# Altium PCB Analog_Project_Channels.PcbDoc (part 1 of 2)
Units mil, origin at the board's own origin, x right, y up, seen from the top; angles counter-clockwise.
Board outline 5930 x 2510 mil, 2 copper layers (Top Layer, Bottom Layer); 96 components, 61 nets, 270 pads, 10 vias.
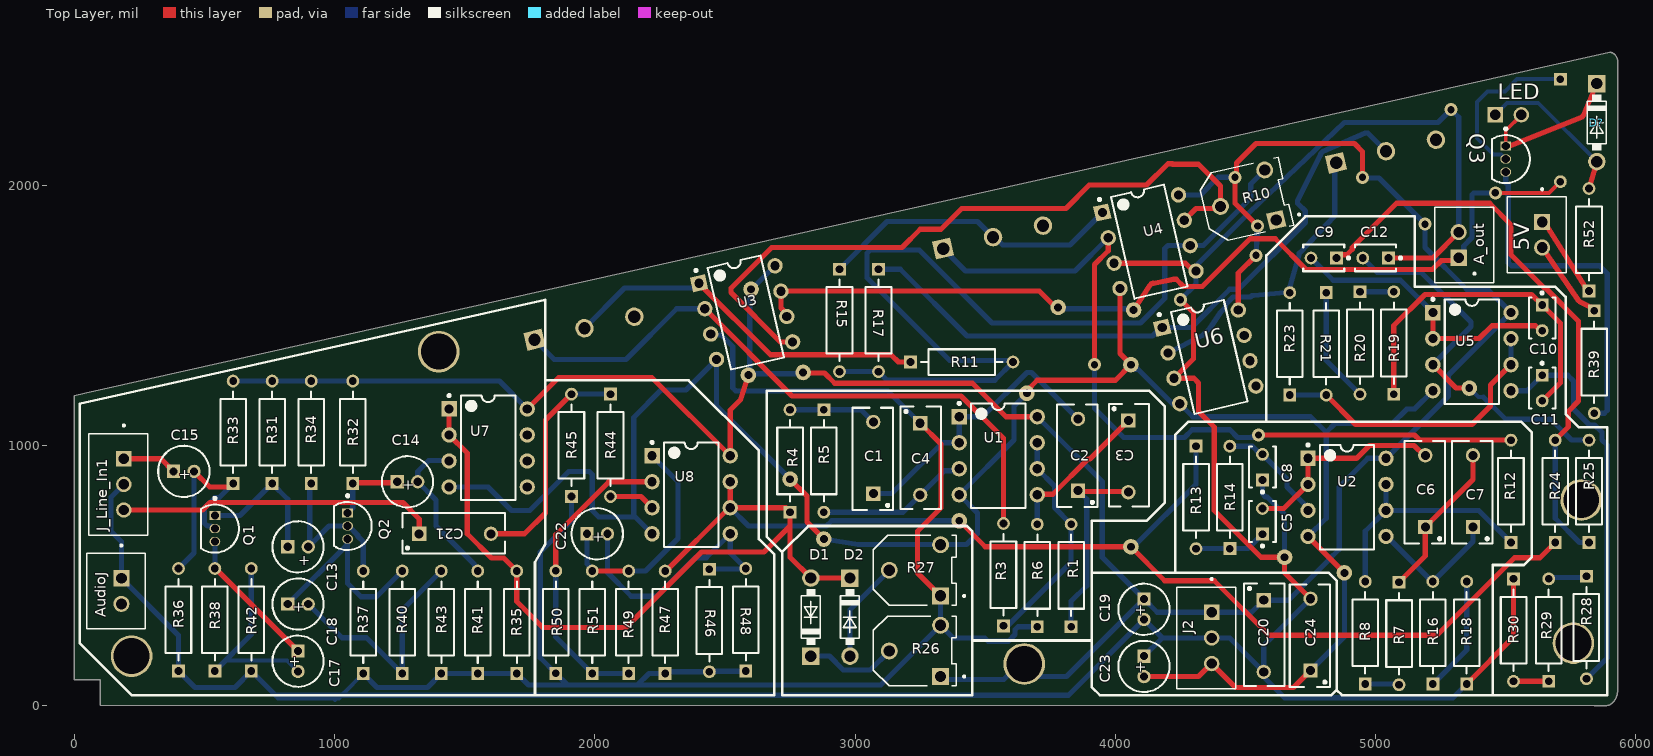
[diagram p0: Top Layer view]
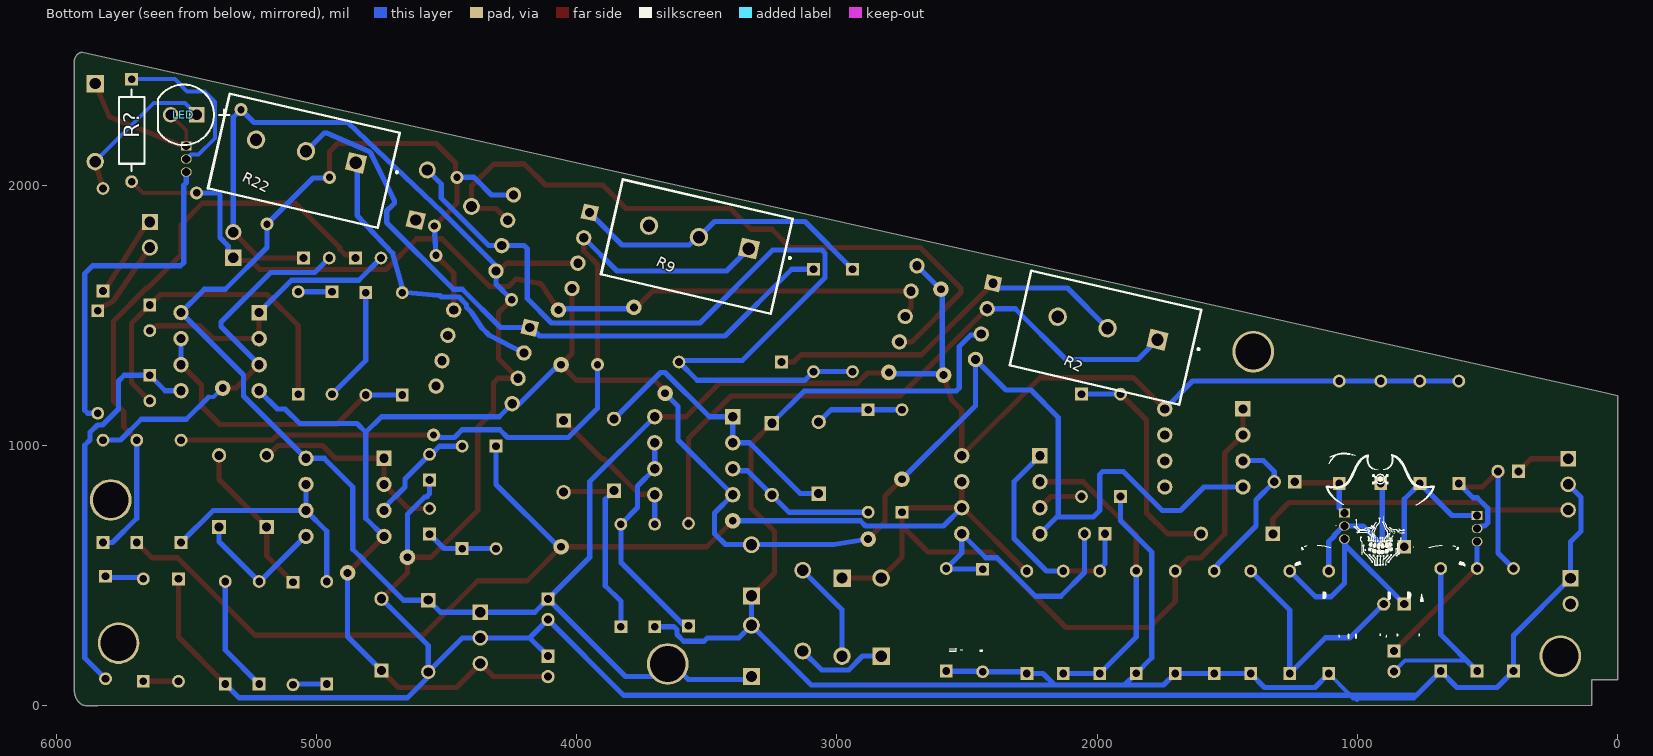
[diagram p1: Bottom Layer view, seen from below]
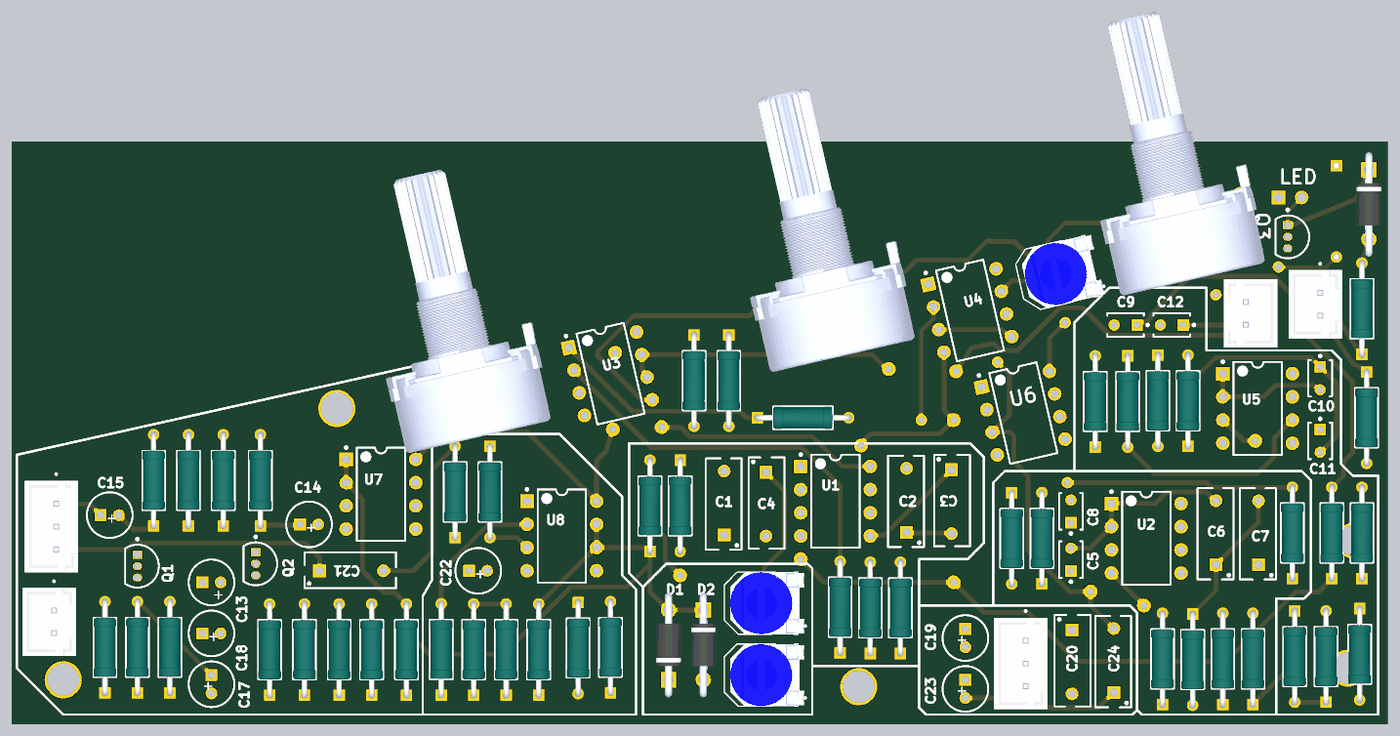
[diagram p2: 3D render of the assembled board from above, using the file's embedded part models]
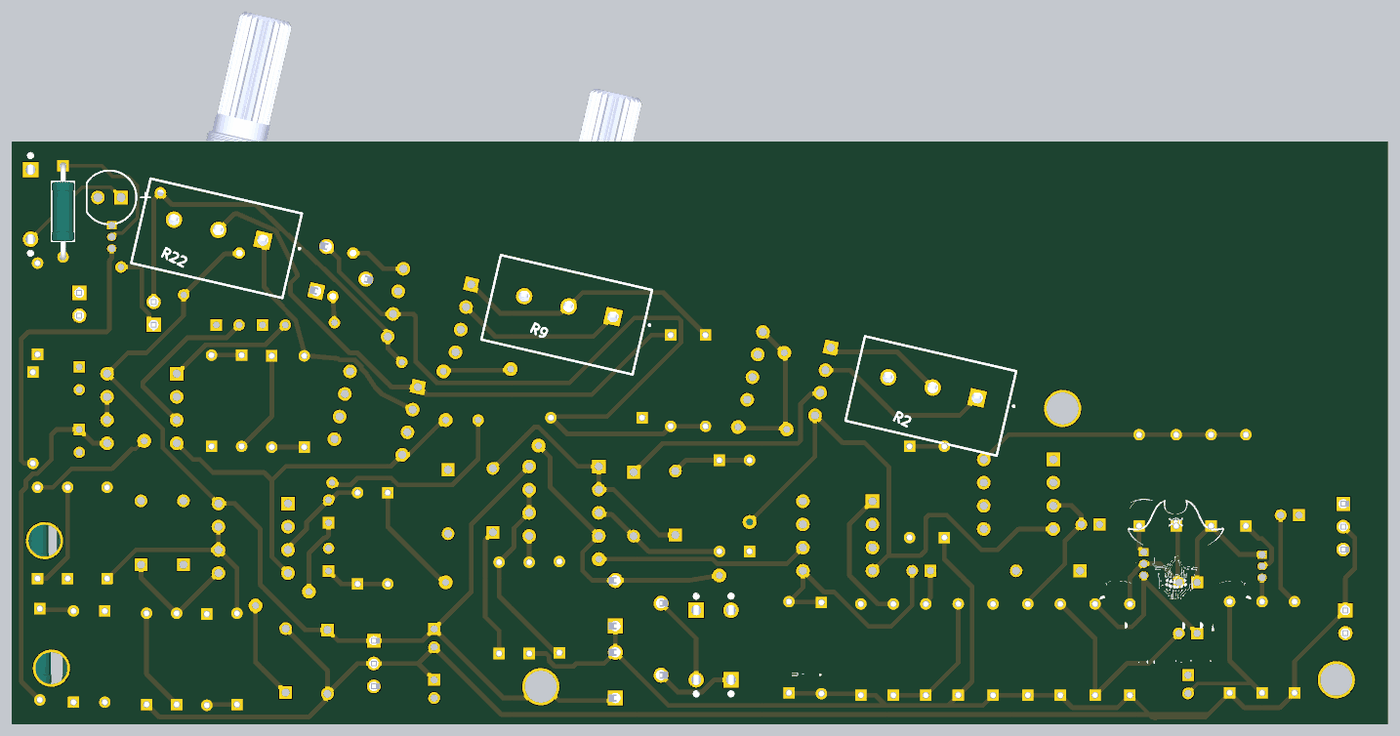
[diagram p3: 3D render of the assembled board from below, using the file's embedded part models]

## Layer stack, top to bottom
Top Solder: solder mask 0.4, Solder Resist, Dk 3.5
Top Layer: signal copper 1.4
Dielectric 1: dielectric 12.6, FR-4, Dk 4.8
Bottom Layer: signal copper 1.4
Bottom Solder: solder mask 0.4, Solder Resist, Dk 3.5

## Board outline
0,100 100,100 100,45.86 100,1.72 5840,0 5885.86,0 ccw(c5885.86,34.14) 5910,10 ccw(c5861.72,58.28) 5930,58.28 5930,2475.86 ccw(c5895.86,2475.86) 5920,2500 5917.07,2502.93 ccw(c5900,2485.86) 5900,2510 40,1200 0,1190

## Design rules (kind name [scope] priority, off if disabled: settings)
BoardOutlineClearance [All] p1: gap=11.81 ignorepadtopadclearanceinfootprint=FALSE except(15.75: Arc-SplitBarrior Arc-SplitContinuation Track-SplitBarrior Track-SplitContinuation SMDPad-SplitBarrior SMDPad-SplitContinuation THPad-SplitBarrior THPad-SplitContinuation Via-SplitBarrior Via-SplitContinuation Fill-SplitBarrior Fill-SplitContinuation Poly-SplitBarrior Poly-SplitContinuation Region-SplitBarrior Region-SplitContinuation Text-SplitBarrior Text-SplitContinuation)
Clearance "Clearance Different Nets" [All] p1: gap=7.87 ignorepadtopadclearanceinfootprint=FALSE except(3.5: Arc-Arc Arc-Track Arc-SMDPad Track-Track Track-SMDPad; 5: SMDPad-SMDPad SMDPad-Via THPad-Via Via-Via; 10: Arc-Via Arc-Text Track-Via Track-Text SMDPad-Text THPad-Text Via-Text Fill-Text Poly-Text Region-Text Text-Text; 19.68: THPad-THPad Via-Hole)
Clearance "Clearance Same Nets" [All] p2: gap=7.87 ignorepadtopadclearanceinfootprint=FALSE except(3.5: Arc-Arc Arc-Track Arc-SMDPad Track-Track Track-SMDPad SMDPad-SMDPad; 5: SMDPad-Via THPad-Via; 10: Arc-Via Arc-Text Track-Via Track-Text SMDPad-Text THPad-Text Via-Via Via-Text Fill-Text Poly-Text Region-Text Text-Text)
Clearance "Clearance Bottom Layer" [OnLayer('Bottom Layer')] p3: gap=8 ignorepadtopadclearanceinfootprint=TRUE except(10: Arc-Text Track-Text SMDPad-Text THPad-Text Via-Text Fill-Text Poly-Text Region-Text Text-Text)
Clearance "Clearance Top Layer" [OnLayer('Top Layer')] p4: gap=8 ignorepadtopadclearanceinfootprint=TRUE except(10: Arc-Text Track-Text SMDPad-Text THPad-Text Via-Text Fill-Text Poly-Text Region-Text Text-Text)
HoleSize [All] p1: absolutevalues=TRUE maxlimit=248.03 minlimit=7.87 maxpercent=80.000 minpercent=20.000
MinimumAnnularRing [All] p1: minimumring=5.12
MinimumSolderMaskSliver [All] p1: minsoldermaskwidth=3.94
PolygonConnect PolygonConnect_1 [All] p1: thpad.connectstyle=Relief thpad.reliefconductorwidth=20 thpad.reliefentries=4 thpad.polygonreliefangle="90 Angle" thpad.airgapwidth=10 smdpad.connectstyle=Relief smdpad.reliefconductorwidth=20 smdpad.reliefentries=4 smdpad.polygonreliefangle="90 Angle" smdpad.airgapwidth=10 via.connectstyle=Direct via.reliefconductorwidth=20 via.reliefentries=4 via.polygonreliefangle="90 Angle" via.airgapwidth=10
RoutingCorners [All] p1: cornerstyle=Round minsetback=100 maxsetback=100
RoutingVias [All] p1: holewidth=19.68 width=39.37 viastyle="Through Hole" minholewidth=7.87 minwidth=13.78 maxholewidth=39.37 maxwidth=78.74
SilkToSilkClearance [All] p1: silktosilkclearance=3.94
SilkToSolderMaskClearance [IsPad] p1: minsilkscreentomaskgap=3.94 clearancetoexposedcopper=TRUE
SolderMaskExpansion [All] p1: expansion=4 istentingtop=FALSE
SupplyNets "Schematic Supply Nets" [InNet('GND')] p1: voltage=0.000
Width [All] p1: maxlimit=100 minlimit=3.5 preferedwidth=15
25 further rules are at their usual default settings.

## Components (designator, comment, footprint, x,y, rotation, side; value= is the part's Value field where it differs from the comment)
5V "B2B-XH-A_(LF)(SN)" JST_B2B-XH-A_(LF)(SN) 5619.33,1809.21 r90 top
A_out "B2B-XH-A_(LF)(SN)" JST_B2B-XH-A_(LF)(SN) 5340,1770 r270 top
AudioJ "B2B-XH-A_(LF)(SN)" JST_B2B-XH-A_(LF)(SN) 160,440 r90 top (schematic designator J_FromAudioJack1)
C1 "100nF 50V Ceramic" "100nF Cap" 3070,949.41 r90 top
C2 "100nF 50V Ceramic" "100nF Cap" 3856.54,961.06 r90 top
C3 "100nF 50V Ceramic" "100nF Cap" 4050,960.59 r270 top
C4 "100nF 50V Ceramic" "100nF Cap" 3250,950 r270 top
C5 "K104K15X7RF5TL2" "10nF Cap" 4565.11,708.12 r90 top
C6 "100nF 50V Ceramic" "100nF Cap" 5190.99,821.07 r90 top
C7 "100nF 50V Ceramic" "100nF Cap" 5373.87,821.07 r90 top
C8 "K104K15X7RF5TL2" "10nF Cap" 4565.11,916.11 r90 top
C9 "K104K15X7RF5TL2" "10nF Cap" 4800.79,1720 r180 top
C10 "K104K15X7RF5TL2" "10nF Cap" 5640,1490 r270 top
C11 "K104K15X7RF5TL2" "10nF Cap" 5640,1220 r270 top
C12 "K104K15X7RF5TL2" "10nF Cap" 5000,1720 r180 top
C13 "ECA1HM100" "10uF 25V" 859.37,610 r0 top
C14 "ECA1HM100" "10uF 25V" 1280,860 r0 top
C15 "ECA1HM100" "10uF 25V" 420.63,900 r0 top
C17 "22uF 50V" "10uF 25V" 859.37,170.63 r270 top
C18 "22uF 50V" "10uF 25V" 859.37,390 r0 top
C19 "ECA1HM100" "10uF 25V" 4110,370 r270 top
C20 "100nF 50V Ceramic" "100nF Cap" 4570,270 r270 top
C21 "100nF 50V Ceramic" "100nF Cap" 1460,660 r0 top
C22 "ECA1HM100" "10uF 25V" 2009.37,660 r0 top
C23 "ECA1HM100" "10uF 25V" 4110,150.63 r270 top
C24 "100nF 50V Ceramic" "100nF Cap" 4750,270 r90 top
D1 "1N4001" 1N400X 2830,340 r90 top
D2 "1N4001" 1N400X 2980,340 r270 top
D? "1N4001" 1N400X 5850,2240 r270 top
J2 "B3B-XH-A_(LF)(SN)" "JST_B3B-XH-A (LF)(SN)" 4349.33,260 r90 top
J_Line_In1 "B3B-XH-A_(LF)(SN)" "JST_B3B-XH-A (LF)(SN)" 169.33,850 r90 top
LED "Comment" CGX-G502DC 5510,2270 r0 bottom
Q1 "BC547B" BC547B#1 540,680 r270 top
Q2 "BC547B" BC547B#1 1050,690 r270 top
Q3 "BC547B" BC547B#2 5500,2100 r270 top
R1 "47K 0.25W" "0.25W Carbon film" 3830,500 r90 top
R2 "Rotary_Pot" Rotary_pot 1768.19,1405.72 r13 bottom
R3 "1K 0.25W" "0.25W Carbon film" 3570,503.15 r90 top value=1kΩ
R4 "3.3K 0.25W" "0.25W Carbon film" 2750,940 r90 top
R5 "3.3K 0.25W" "0.25W Carbon film" 2880,940 r270 top
R6 "47K 0.25W" "0.25W Carbon film" 3700,500 r90 top
R7 "3.3K 0.25W" "0.25W Carbon film" 5090,276.85 r270 top
R8 "3.3K 0.25W" "0.25W Carbon film" 4960,280 r90 top
R9 "Rotary_Pot" Rotary_pot 3338.19,1755.72 r13 bottom
R10 "TRIM_pot" TRIM_Pot 4500,1940 r13 top
R11 "66K 0.5W" "0.25W Carbon film" 3410,1320 r0 top
R12 "1K 0.25W" "0.25W Carbon film" 5520,823.15 r90 top value=1kΩ
R13 "3.3K 0.25W" "0.25W Carbon film" 4310,800 r270 top
R14 "3.3K 0.25W" "0.25W Carbon film" 4440,800 r90 top
R15 "66K 0.5W" "0.25W Carbon film" 2940,1480 r270 top
R16 "3.3K 0.25W" "0.25W Carbon film" 5220,280 r90 top
R17 "66K 0.5W" "0.25W Carbon film" 3090,1480 r270 top
R18 "3.3K 0.25W" "0.25W Carbon film" 5350,280 r90 top
R19 "470R 0.25W" "0.25W Carbon film" 5070,1393.15 r90 top
R20 "1K 0.25W" "0.25W Carbon film" 4940,1393.15 r270 top value=1kΩ
R21 "1K 0.25W" "0.25W Carbon film" 4810,1390 r270 top value=1kΩ
R22 "Rotary_Pot" Rotary_pot 4848.19,2085.72 r13 bottom
R23 "1K 0.25W" "0.25W Carbon film" 4670,1390 r90 top value=1kΩ
R24 "680R 0.25W" "0.25W Carbon film" 5690,823.15 r90 top
R25 "680R 0.25W" "0.25W Carbon film" 5820,823.15 r90 top
R26 "TRIM_pot" TRIM_Pot 3230,210 r0 top
R27 "TRIM_pot" TRIM_Pot 3230,520 r0 top
R28 "1K 0.25W" "0.25W Carbon film" 5810,300 r270 top value=1kΩ
R29 "1K 0.25W" "0.25W Carbon film" 5665,290 r90 top value=1kΩ
R30 "470R 0.25W" "0.25W Carbon film" 5530,290 r270 top
R31 "3.3K 0.25W" "0.25W Carbon film" 760,1050 r90 top
R32 "3.3K 0.25W" "0.25W Carbon film" 1070,1050 r90 top
R33 "47K 0.25W" "0.25W Carbon film" 610,1050 r90 top
R34 "470K 0.25W" "0.25W Carbon film" 910,1050 r90 top
R35 "470K 0.25W" "0.25W Carbon film" 1700,320 r90 top
R36 "10K 0.25W" "0.25W Carbon film" 400,330 r90 top
R37 "100K 0.25W" "0.25W Carbon film" 1110,320 r90 top
R38 "330R 0.25W" "0.25W Carbon film" 540,330 r90 top
R39 "1K 0.5W" "0.25W Carbon film" 5840,1320 r270 top value=1kΩ
R40 "330R 0.25W" "0.25W Carbon film" 1260,320 r90 top
R41 "100K 0.25W" "0.25W Carbon film" 1550,320 r90 top
R42 "220R 0.25W" "0.25W Carbon film" 680,330 r90 top
R43 "220R 0.25W" "0.25W Carbon film" 1410,320 r90 top
R44 "3.3K 0.25W" "0.25W Carbon film" 2060,1000 r270 top
R45 "100K 0.25W" "0.25W Carbon film" 1910,1000 r90 top
R46 "47K 0.25W" "0.25W Carbon film" 2440,326.85 r270 top
R47 "470K 0.25W" "0.25W Carbon film" 2270,320 r90 top
R48 "470K 0.25W" "0.25W Carbon film" 2580,330 r90 top
R49 "47K 0.25W" "0.25W Carbon film" 2130,320 r90 top
R50 "3.3K 0.25W" "0.25W Carbon film" 1850,320.69 r90 top
R51 "47K 0.25W" "0.25W Carbon film" 1990,320 r90 top
R52 "1K 0.25W" "0.25W Carbon film" 5820,1790 r90 top value=1kΩ
R? "1K 0.5W" "0.25W Carbon film" 5710,2210 r270 bottom value=1kΩ
U1 "NE5532AP" NE5532 3550,960 r0 top
U2 "NE5532AP" NE5532 4890,800 r0 top
U3 "NE5532AP" NE5532 2580,1510 r13 top
U4 "NE5532AP" NE5532 4130.1,1782.41 r13 top
U5 "NE5532AP" NE5532 5370,1360 r0 top
U6 "NE5532AP" NE5532 4360,1340 r13 top
U7 "NE5532AP" NE5532 1590,990 r0 top
U8 "NE5532AP" NE5532 2370,810 r0 top

## Footprints (in the part's own frame and the unit in brackets; to place one, negate y for a bottom-side part, rotate by r counter-clockwise, add the part's x,y. Pads: shape width x height; smd on the part's side, far side on the other; paste and mask are expansions set on the pad)
"0.25W Carbon film" [mm]
  rect 1.25x1.25 hole 0.75 paste-2539.97 mask+0: 1(-5,0)
  round 1.25 hole 0.75 paste-2539.97 mask+0: 2(5,0)
  silkscreen extent -3.98,-1.25 3.98,1.25, body extent -5.72,-1.35 5.72,1.35, height 0.25
1N400X [mm]
  round 1.7 hole 1.1: A(3.81,0)
  rect 1.7x1.7 / inner round 1.7 / far side rect 1.7x1.7 hole 1.1: C(-3.81,0)
  silkscreen extent -2.72,-0.95 2.72,0.92, body extent -5.74,-1.35 5.74,1.35, height 2.74
"10nF Cap" [mm] "THD, 2-Leads, Body 4x2.6mm"
  rect 1.25x1.25 hole 0.75: 1(-1.25,0)
  round 1.25 hole 0.75: 2(1.25,0)
  silkscreen extent -2.55,-1.3 2,1.3, body extent -2,-1.3 2,1.3, height 5.6
"10uF 25V" [mm] "THD, 2-Leads, Dia 5mm, Body Length 11mm"
  rect 1.3x1.3 hole 0.8: 1(-1,0)
  round 1.3 hole 0.8: 2(1,0)
  silkscreen extent -2.5,-2.5 2.5,2.5, body extent -2.5,-2.5 2.5,2.5, height 12
"100nF Cap" [mil] "THD, 2-Leads, Body 4x2.6mm"
  rect 55x55 hole 35: 1(-135,0)
  round 55 hole 35: 2(140.59,0)
  silkscreen extent -199,-75 195,80, body extent -199,-76 192,80, height 394
BC547B#1 [mm] "TO, 3-Leads, Body Dia 4.7mm, Pitch 1.27mm"
  rect 0.889x1.05 hole 0.8: 1(-1.27,0)
  oval 0.889x1.05 hole 0.762: 2(0,0)
  oval 0.889x1.05 hole 0.8: 3(1.27,0)
  silkscreen extent -3.07,-1.34 2.35,2.35, body extent -2.35,-1.33 2.36,2.36, height 7.87
BC547B#2 [mm] "TO, 3-Leads, Body Dia 4.7mm, Pitch 1.27mm"
  rect 0.889x1.05 hole 0.8: 1(-1.27,0)
  oval 0.889x1.05 hole 0.8: 2(0,0) 3(1.27,0)
  silkscreen extent -3.07,-1.34 2.35,2.35, body extent -2.35,-1.33 2.36,2.36, height 7.87
CGX-G502DC [mm] "THD, 2-Leads, Dia 5.9mm, Pin Spacing 2.54mm"
  rect 1.5x1.5 hole 1: 1(-1.27,0)
  round 1.5 hole 1: 2(1.27,0)
  silkscreen extent -4.45,-2.95 2.5,2.95, body extent -2.95,-2.95 2.5,2.95, height 9.1
JST_B2B-XH-A_(LF)(SN) [mm]
  rect 1.575x1.575 / inner round 1.575 / far side rect 1.575x1.575 hole 1.05: 1(1.25,-0.525)
  round 1.575 hole 1.05: 2(-1.25,-0.525)
  silkscreen extent -3.7,-2.88 4.54,2.88, body extent -3.7,-2.88 3.7,2.88, height 7
"JST_B3B-XH-A (LF)(SN)" [mm]
  rect 1.508x1.508 / inner round 1.508 / far side rect 1.508x1.508 hole 1: 1(2.5,-0.525)
  round 1.508 hole 1: 2(0,-0.525) 3(-2.5,-0.525)
  silkscreen extent -4.95,-2.88 5.85,2.88, body extent -4.95,-2.88 4.95,2.88, height 7
NE5532 [mm] "DIP, 8-Leads, Body 10.15x6.6mm, Pitch 2.54mm"
  rect 1.5x1.5 hole 0.9: 1(-3.81,3.81)
  round 1.5 hole 0.9: 2(-3.81,1.27) 3(-3.81,-1.27) 4(-3.81,-3.81) 5(3.81,-3.81) 6(3.81,-1.27) 7(3.81,1.27) 8(3.81,3.81)
  silkscreen extent -3.93,-5.1 2.65,5.23, body extent -3.95,-5.07 3.95,5.07, height 5.08
Rotary_pot [mm]
  rect 1.8x1.8 / inner round 1.8 / far side rect 1.8x1.8 hole 1.2: 1(0,0)
  round 1.8 hole 1.2: 2(5,0) 3(10,0)
  silkscreen extent -4.2,-3.81 13.5,5.69, body extent -3.41,-23.91 13.59,5.59, height 2.8
TRIM_Pot [mm]
  rect 1.65x1.65 / inner round 1.65 / far side rect 1.65x1.65 hole 1.1: 1(2.5,-2.5)
  round 1.65 hole 1.1: 2(-2.5,0) 3(2.5,2.5)
  silkscreen extent -4.05,-3.41 4.9,3.41, body extent -3.4,-3.41 4.7,3.41, height 8.38

## Part data
5V A_out AudioJ: "Connector Header Through Hole 2 position 0.098 (2.50mm)", Package=None, Check_prices=https://www.snapeda.com/parts/B2B-XH-A%20(LF)(SN)/JST+Sales+America+Inc./view-part/?ref=eda, MF="JST Sales", MP="B2B-XH-A (LF)(SN)", SnapEDA_Link=https://www.snapeda.com/parts/B2B-XH-A%20(LF)(SN)/JST+Sales+America+Inc./view-part/?ref=snap
C1 C2 C3 C4 C6 C7 C20 C21 C24: "Ceramic Capacitor, 100 nF, +/- 10%, 50 V, -55 to 125 degC, 2-Pin THD, RoHS, Tape and Reel", Capacitance=0.1µF, Manufacturer=Vishay, Operating Temperature=-55°C~125°C, Package / Case=Radial, Package Description="2-Pin Through Hole Device, Body 4 x 2.6 mm", Package Reference=K104K15X7RF5TL2, Ratings=-, Standard Package=1, Temperature Coefficient=X7R, Tolerance=±10%, Voltage - Rated=50V, Applications=GeneralPurpose, Catalog Drawings=Mono-KapSide2-15_5.58Mono-KapSide1_15, Category=Capacitors, Datasheet URL=http://www.vishay.com/docs/45171/kseries.pdf, Datasheet Version=08/2013, Family=CeramicCapacitors, Features=-, Height - Seated (Max)="0.220\"(5.58mm)", Lead Spacing="0.098\"(2.50mm)", Lead Style=Straight, Manufacturer URL=http://www.vishay.com/, Mounting Technology=ThroughHole, Mounting Type=ThroughHole, Online Catalog=Mono-Kap™Series, Other Names=BC1084CT, Packaging=CutTape(CT), Series=Mono-Kap™K, Size / Dimension="0.157\"Lx0.098\"W(4.00mmx2.50mm)", Thickness (Max)=-
C5 C8 C9 C10 C11 C12: library part "10nF 50V Ceramic", "Ceramic Capacitor, 100 nF, +/- 10%, 50 V, -55 to 125 degC, 2-Pin THD, RoHS, Tape and Reel", Capacitance=0.1µF, Manufacturer=Vishay, Operating Temperature=-55°C~125°C, Package / Case=Radial, Package Description="2-Pin Through Hole Device, Body 4 x 2.6 mm", Ratings=-, Standard Package=1, Temperature Coefficient=X7R, Tolerance=±10%, Voltage - Rated=50V, Applications=GeneralPurpose, Catalog Drawings=Mono-KapSide2-15_5.58Mono-KapSide1_15, Category=Capacitors, Datasheet URL=http://www.vishay.com/docs/45171/kseries.pdf, Datasheet Version=08/2013, Family=CeramicCapacitors, Features=-, Height - Seated (Max)="0.220\"(5.58mm)", Lead Spacing="0.098\"(2.50mm)", Lead Style=Straight, Manufacturer URL=http://www.vishay.com/, Mounting Technology=ThroughHole, Mounting Type=ThroughHole, Online Catalog=Mono-Kap™Series, Other Names=BC1084CT, Package Reference=K104K15X7RF5TL2, Packaging=CutTape(CT), Series=Mono-Kap™K, Size / Dimension="0.157\"Lx0.098\"W(4.00mmx2.50mm)", Thickness (Max)=-
C13 C14: library part "10uF 50V", "Aluminum Electrolytic Capacitor, 10 uF, +/- 20%, 50 V, -40 to 85 degC, 2-Pin THD, RoHS, Bulk", Capacitance=10uF, Case/Package=Radial, Dielectric Material=Aluminium, Leakage Current=3uA, Manufacturer=Panasonic, Max Operating Temperature=85degC, Min Operating Temperature=-40degC, Package Description="2-Pin Radial Lead, Dia 5 mm, Height 12 mm", Package Quantity=200, Package Reference=CAPPR55-200-1100X500X1200, Ripple Current=65mA, Tolerance=20%, Voltage=50V, Datasheet URL=https://industrial.panasonic.com/cdbs/www-data/pdf/RDF0000/ABA0000C1218.pdf, Datasheet Version="Rev. 05, 10/2016", Diameter=5mm, Dissipation Factor=0.12%, Height=11mm, Height - Seated (Max)=0.472inch, Lead Diameter=0.5mm, Lead Free=LeadFree, Lead Pitch=2mm, Lead/Base Style=Straight, Length=11mm, Life (Hours)=2000Hour, Manufacturer URL=http://www.panasonic.com/, Mount=ThroughHole, Number of Pins=2, Packaging=Bulk, Radiation Hardening=No, REACH SVHC=NoSVHC, Ripple Current (AC)=65mA, RoHSCompliant=true, Termination=Radial, Voltage Rating=50V, Voltage Rating (DC)=50V
C15 C19 C22 C23: library part "2.2uF 50V", "Aluminum Electrolytic Capacitor, 10 uF, +/- 20%, 50 V, -40 to 85 degC, 2-Pin THD, RoHS, Bulk", Capacitance=10uF, Case/Package=Radial, Dielectric Material=Aluminium, Leakage Current=3uA, Manufacturer=Panasonic, Max Operating Temperature=85degC, Min Operating Temperature=-40degC, Package Description="2-Pin Radial Lead, Dia 5 mm, Height 12 mm", Package Quantity=200, Package Reference=CAPPR55-200-1100X500X1200, Ripple Current=65mA, Tolerance=20%, Voltage=50V, Datasheet URL=https://industrial.panasonic.com/cdbs/www-data/pdf/RDF0000/ABA0000C1218.pdf, Datasheet Version="Rev. 05, 10/2016", Diameter=5mm, Dissipation Factor=0.12%, Height=11mm, Height - Seated (Max)=0.472inch, Lead Diameter=0.5mm, Lead Free=LeadFree, Lead Pitch=2mm, Lead/Base Style=Straight, Length=11mm, Life (Hours)=2000Hour, Manufacturer URL=http://www.panasonic.com/, Mount=ThroughHole, Number of Pins=2, Packaging=Bulk, Radiation Hardening=No, REACH SVHC=NoSVHC, Ripple Current (AC)=65mA, RoHSCompliant=true, Termination=Radial, Voltage Rating=50V, Voltage Rating (DC)=50V
C17 C18: "Aluminum Electrolytic Capacitor, 10 uF, +/- 20%, 50 V, -40 to 85 degC, 2-Pin THD, RoHS, Bulk", Capacitance=10uF, Case/Package=Radial, Dielectric Material=Aluminium, Leakage Current=3uA, Manufacturer=Panasonic, Max Operating Temperature=85degC, Min Operating Temperature=-40degC, Package Description="2-Pin Radial Lead, Dia 5 mm, Height 12 mm", Package Quantity=200, Package Reference=CAPPR55-200-1100X500X1200, Ripple Current=65mA, Tolerance=20%, Voltage=50V, Datasheet URL=https://industrial.panasonic.com/cdbs/www-data/pdf/RDF0000/ABA0000C1218.pdf, Datasheet Version="Rev. 05, 10/2016", Diameter=5mm, Dissipation Factor=0.12%, Height=11mm, Height - Seated (Max)=0.472inch, Lead Diameter=0.5mm, Lead Free=LeadFree, Lead Pitch=2mm, Lead/Base Style=Straight, Length=11mm, Life (Hours)=2000Hour, Manufacturer URL=http://www.panasonic.com/, Mount=ThroughHole, Number of Pins=2, Packaging=Bulk, Radiation Hardening=No, REACH SVHC=NoSVHC, Ripple Current (AC)=65mA, RoHSCompliant=true, Termination=Radial, Voltage Rating=50V, Voltage Rating (DC)=50V
D1 D2 D?: "DIODE, STANDARD, 1A, 50V, DO-204AL-2; Diode Type: Standard Recovery; Diode Config", Average Rectified Current=1A, Forward Voltage=1.1V, Manufacturer=Vishay, Manufacturer Part Number=1N4001-E3/73, Max Forward Surge Current (Ifsm)=30A, Max Junction Temperature (Tj)=150°C, Max Repetitive Reverse Voltage (Vrrm)=50V, Min Operating Temperature=-50°C, Package="DO-41 Vishay Semiconductor", Peak Non-Repetitive Surge Current=45A, Peak Reverse Current=5µA, Supplier Part Number=1N4001-E3/73GICT-ND, Category="Rectifier Diodes", Check_prices=https://www.snapeda.com/parts/1N4007E-E3/64/Vishay/view-part/?ref=eda, China RoHS=Non-Compliant, ComponentLink1Description=https://datasheet.octopart.com:443/1N4001-E3-73-Vishay-datasheet-168682104.pdf?src-supplier=Newark, ComponentLink1URL=https://datasheet.octopart.com:443/1N4001-E3-73-Vishay-datasheet-168682104.pdf?src-supplier=Newark, ComponentLink2Description=https://datasheet.octopart.com:443/1N4001-E3-73-Vishay-datasheet-11547366.pdf?src-supplier=Newark, ComponentLink2URL=https://datasheet.octopart.com:443/1N4001-E3-73-Vishay-datasheet-11547366.pdf?src-supplier=Newark, ComponentLink3Description=https://datasheet.octopart.com:443/1N4001-E3-73-Vishay-datasheet-8381009.pdf?src-supplier=Newark, ComponentLink3URL=https://datasheet.octopart.com:443/1N4001-E3-73-Vishay-datasheet-8381009.pdf?src-supplier=Newark, ComponentLink4Description=https://datasheet.octopart.com:443/1N4001-E3-73-Vishay-datasheet-519570.pdf?src-supplier=Newark, ComponentLink4URL=https://datasheet.octopart.com:443/1N4001-E3-73-Vishay-datasheet-519570.pdf?src-supplier=Newark, ComponentLink5Description=https://datasheet.octopart.com:443/1N4001-E3-73-Vishay-datasheet-41303593.pdf?src-supplier=Newark, ComponentLink5URL=https://datasheet.octopart.com:443/1N4001-E3-73-Vishay-datasheet-41303593.pdf?src-supplier=Newark, ComponentLink6Description=https://datasheet.octopart.com:443/1N4001-E3-73-Vishay-datasheet-62317716.pdf?src-supplier=element14+APAC, ComponentLink6URL=https://datasheet.octopart.com:443/1N4001-E3-73-Vishay-datasheet-62317716.pdf?src-supplier=element14+APAC, ComponentLink7Description=https://datasheet.octopart.com:443/1N4001-E3-73-Vishay-datasheet-41195573.pdf?src-supplier=Farnell, ComponentLink7URL=https://datasheet.octopart.com:443/1N4001-E3-73-Vishay-datasheet-41195573.pdf?src-supplier=Farnell, ComponentLink8Description=http://sigma.octopart.com:80/rohs_statement/Vishay-company-15.pdf?src-supplier=Compliance+Statements, ComponentLink8URL=http://sigma.octopart.com:80/rohs_statement/Vishay-company-15.pdf?src-supplier=Compliance+Statements, Contact Plating=Tin, Current=1A, Element Configuration=Single, Forward Current=1A, Height=2.7mm, Length=5.2mm, Lifecycle Status=Production, Max Operating Temperature=150°C, Max Output current=1A, Max Reverse Voltage (DC)=50V, Max Surge Current=30A, MF="Vishay Semiconductor", Mounting Technology="Through Hole", MP=1N4007E-E3/64, Number of Elements=1, Number of Terminals=2, Pins=2, Pricing="1=0.15, 10=0.101, 100=0.0827, 500=0.06926 (USD)", Radiation Hardening=No, REACH SVHC=No, Reverse Standoff Voltage=50V, Reverse Voltage=50V, RoHS=Compliant, Schedule B="8541100080, 8541100080|8541100080|8541100080|8541100080|8541100080", SnapEDA_Link=https://www.snapeda.com/parts/1N4007E-E3/64/Vishay/view-part/?ref=snap, Stock=29129, Supplier=DigiKey, Voltage=50V, Width=2.7mm
J2 J_Line_In1: "Connector Header Through Hole 3 position 0.098 (2.50mm)", Package=None, Check_prices=https://www.snapeda.com/parts/B3B-XH-A%20(LF)(SN)/JST+Sales+America+Inc./view-part/?ref=eda, MF="JST Sales America Inc.", MP="B3B-XH-A (LF)(SN)", SnapEDA_Link=https://www.snapeda.com/parts/B3B-XH-A%20(LF)(SN)/JST+Sales+America+Inc./view-part/?ref=snap
Q1 Q2 Q3: "BC547 Series 45 V CE Breakdown .1 A NPN Epitaxial Silicon Transistor - TO-92", Case/Package=TO-92, Clock Frequency=300MHz, Collector Base Voltage (VCBO)=50V, Collector Emitter Breakdown Voltage=45V, Collector Emitter Saturation Voltage=250mV, Current=1A, Current Rating=100mA, Emitter Base Voltage (VEBO)=6V, Manufacturer="On Semiconductor", Manufacturer Lifecycle Status=ACTIVE, Manufacturer Package Identifier=MKT-ZA03DREV3, Max Operating Temperature=150°C, Max Power Dissipation=625mW, Min Operating Temperature=-65°C, Power Dissipation=500mW, Supplier Part Number=BC547BFS-ND, Voltage=40V, Category=BJTs, China RoHS=Compliant, Collector Emitter Voltage (VCEO)=45V, ComponentLink1Description="Manufacturer URL", ComponentLink1URL=http://www.onsemi.com/, ComponentLink2Description=Datasheet, ComponentLink2URL=http://www.onsemi.com/pub_link/Collateral/BC546-D.PDF, ComponentLink3Description="Package Specification", ComponentLink3URL=http://www.onsemi.cn/pub_link/Collateral/2N6426-D.PDF, ComponentLink4Description=https://datasheet.octopart.com:443/BC547B-onsemi-datasheet-180957945.pdf?src-supplier=IHS, ComponentLink4URL=https://datasheet.octopart.com:443/BC547B-onsemi-datasheet-180957945.pdf?src-supplier=IHS, ComponentLink5Description=https://datasheet.octopart.com:443/BC547B-Fairchild-Semiconductor-datasheet-34208604.pdf?src-supplier=IHS, ComponentLink5URL=https://datasheet.octopart.com:443/BC547B-Fairchild-Semiconductor-datasheet-34208604.pdf?src-supplier=IHS, ComponentLink6Description=https://datasheet.octopart.com:443/BC547B-ON-Semiconductor-datasheet-11548122.pdf?src-supplier=Master+Electronics, ComponentLink6URL=https://datasheet.octopart.com:443/BC547B-ON-Semiconductor-datasheet-11548122.pdf?src-supplier=Master+Electronics, ComponentLink7Description=https://datasheet.octopart.com:443/BC547B-ON-Semiconductor-datasheet-26353630.pdf?src-supplier=Upverter, ComponentLink7URL=https://datasheet.octopart.com:443/BC547B-ON-Semiconductor-datasheet-26353630.pdf?src-supplier=Upverter, ComponentLink8Description=https://datasheet.octopart.com:443/BC547B-ON-Semiconductor-datasheet-574670.pdf?src-supplier=onsemi, ComponentLink8URL=https://datasheet.octopart.com:443/BC547B-ON-Semiconductor-datasheet-574670.pdf?src-supplier=onsemi, ComponentLink9Description=https://datasheet.octopart.com:443/BC547B-ON-Semiconductor-datasheet-151678557.pdf?src-supplier=onsemi, ComponentLink9URL=https://datasheet.octopart.com:443/BC547B-ON-Semiconductor-datasheet-151678557.pdf?src-supplier=onsemi, ComponentLink10Description=https://datasheet.octopart.com:443/BC547B-ON-Semiconductor-datasheet-86688575.pdf?src-supplier=onsemi, ComponentLink10URL=https://datasheet.octopart.com:443/BC547B-ON-Semiconductor-datasheet-86688575.pdf?src-supplier=onsemi, ComponentLink11Description=https://datasheet.octopart.com:443/BC547B-Fairchild-datasheet-7074.pdf?src-supplier=Fairchild+Semiconductor, ComponentLink11URL=https://datasheet.octopart.com:443/BC547B-Fairchild-datasheet-7074.pdf?src-supplier=Fairchild+Semiconductor, ComponentLink12Description=https://sigma.octopart.com:443/8329026/technical_drawing/Fairchild-Semiconductor-BC547B.pdf?src-supplier=Fairchild+Semiconductor, ComponentLink12URL=https://sigma.octopart.com:443/8329026/technical_drawing/Fairchild-Semiconductor-BC547B.pdf?src-supplier=Fairchild+Semiconductor, ComponentLink13Description=https://datasheet.octopart.com:443/BC547B-ON-Semiconductor-datasheet-105062517.pdf?src-supplier=Future+Electronics, ComponentLink13URL=https://datasheet.octopart.com:443/BC547B-ON-Semiconductor-datasheet-105062517.pdf?src-supplier=Future+Electronics, ComponentLink14Description=https://datasheet.octopart.com:443/BC547B-ON-Semiconductor-datasheet-86684081.pdf?src-supplier=element14+APAC, ComponentLink14URL=https://datasheet.octopart.com:443/BC547B-ON-Semiconductor-datasheet-86684081.pdf?src-supplier=element14+APAC, ComponentLink15Description=https://datasheet.octopart.com:443/BC547B-Fairchild-Semiconductor-datasheet-7537324.pdf?src-supplier=Farnell, ComponentLink15URL=https://datasheet.octopart.com:443/BC547B-Fairchild-Semiconductor-datasheet-7537324.pdf?src-supplier=Farnell, ComponentLink16Description=https://datasheet.octopart.com:443/BC547B-Fairchild-Semiconductor-datasheet-637514.pdf?src-supplier=Farnell, ComponentLink16URL=https://datasheet.octopart.com:443/BC547B-Fairchild-Semiconductor-datasheet-637514.pdf?src-supplier=Farnell, ComponentLink17Description=https://datasheet.octopart.com:443/BC547B-ON-Semiconductor-datasheet-6055.pdf?src-supplier=DigiKey, ComponentLink17URL=https://datasheet.octopart.com:443/BC547B-ON-Semiconductor-datasheet-6055.pdf?src-supplier=DigiKey, ComponentLink18Description=https://datasheet.octopart.com:443/BC547B-Fairchild-Semiconductor-datasheet-67878763.pdf?src-supplier=Newark, ComponentLink18URL=https://datasheet.octopart.com:443/BC547B-Fairchild-Semiconductor-datasheet-67878763.pdf?src-supplier=Newark, ComponentLink19Description=https://datasheet.octopart.com:443/BC547B-Fairchild-Semiconductor-datasheet-78861862.pdf?src-supplier=Newark, ComponentLink19URL=https://datasheet.octopart.com:443/BC547B-Fairchild-Semiconductor-datasheet-78861862.pdf?src-supplier=Newark, ComponentLink20Description=http://sigma.octopart.com:80/150605340/rohs_statement/ON-Semiconductor-BC547B.pdf?src-supplier=Compliance+Statements, ComponentLink20URL=http://sigma.octopart.com:80/150605340/rohs_statement/ON-Semiconductor-BC547B.pdf?src-supplier=Compliance+Statements, ComponentLink21Description=http://sigma.octopart.com:80/23426736/rohs_statement/Fairchild-Semiconductor-BC547B.pdf?src-supplier=Compliance+Statements, ComponentLink21URL=http://sigma.octopart.com:80/23426736/rohs_statement/Fairchild-Semiconductor-BC547B.pdf?src-supplier=Compliance+Statements, ComponentLink22Description=http://sigma.octopart.com:80/23426737/materials_sheet/Fairchild-Semiconductor-BC547B.pdf?src-supplier=Compliance+Statements, ComponentLink22URL=http://sigma.octopart.com:80/23426737/materials_sheet/Fairchild-Semiconductor-BC547B.pdf?src-supplier=Compliance+Statements, ComponentLink23Description=http://sigma.octopart.com:80/33052967/reach_statement/Fairchild-Semiconductor-BC547B.pdf?src-supplier=Compliance+Statements, ComponentLink23URL=http://sigma.octopart.com:80/33052967/reach_statement/Fairchild-Semiconductor-BC547B.pdf?src-supplier=Compliance+Statements, ComponentLink24Description=http://sigma.octopart.com:80/33053049/materials_sheet/Fairchild-Semiconductor-BC547B.pdf?src-supplier=Compliance+Statements, ComponentLink24URL=http://sigma.octopart.com:80/33053049/materials_sheet/Fairchild-Semiconductor-BC547B.pdf?src-supplier=Compliance+Statements, ComponentLink25Description=http://sigma.octopart.com:80/reach_statement/ON-Semiconductor-company-79.pdf?src-supplier=Compliance+Statements, ComponentLink25URL=http://sigma.octopart.com:80/reach_statement/ON-Semiconductor-company-79.pdf?src-supplier=Compliance+Statements, ComponentLink26Description=http://sigma.octopart.com:80/rohs_statement/Fairchild-Semiconductor-company-11.pdf?src-supplier=Compliance+Statements, ComponentLink26URL=http://sigma.octopart.com:80/rohs_statement/Fairchild-Semiconductor-company-11.pdf?src-supplier=Compliance+Statements, ComponentLink27Description=http://sigma.octopart.com:80/rohs_statement/Fairchild-Semiconductor-company-10.pdf?src-supplier=Compliance+Statements, ComponentLink27URL=http://sigma.octopart.com:80/rohs_statement/Fairchild-Semiconductor-company-10.pdf?src-supplier=Compliance+Statements, ComponentLink28Description=http://sigma.octopart.com:80/reach_statement/Fairchild-Semiconductor-company-9.pdf?src-supplier=Compliance+Statements, ComponentLink28URL=http://sigma.octopart.com:80/reach_statement/Fairchild-Semiconductor-company-9.pdf?src-supplier=Compliance+Statements, ComponentLink29Description=https://octopart.com:443/opatz8j6/c1?t=Wh0HLASlSBeZaUiz3GayB3OWGMt4DmM6z_ZHtko5fz1ybrcnR6Q5ICyIXUvgUGErCw6SavT9HUoF3FtEPIgT2pvj8H4VDy6Hd6AutYjKCWRDmj_avBiiD6MDUQmCYL58rHETmzfTDop89euoDPYG6n7EpgAR1EK3peF7mSphNTJXxp5tzGfvJXgXxfT9ZK4QqXLLKUAGmSHxm0lcR-ipPWnbnyTSZFp2lUUaaeJmZTWgQRT_ULvLk_dzj5KOmkpKoSPCuaKPqYqmAx_zP3CUHOEPTgvu2NcgXvP0ixksM_8BtOyVVK_YA_YYSP8TmFX2wgVu4HOJ81tq2U284no1t_dGaXacBRgQ&src-supplier=Compliance+Statements, ComponentLink29URL=https://octopart.com:443/opatz8j6/c1?t=Wh0HLASlSBeZaUiz3GayB3OWGMt4DmM6z_ZHtko5fz1ybrcnR6Q5ICyIXUvgUGErCw6SavT9HUoF3FtEPIgT2pvj8H4VDy6Hd6AutYjKCWRDmj_avBiiD6MDUQmCYL58rHETmzfTDop89euoDPYG6n7EpgAR1EK3peF7mSphNTJXxp5tzGfvJXgXxfT9ZK4QqXLLKUAGmSHxm0lcR-ipPWnbnyTSZFp2lUUaaeJmZTWgQRT_ULvLk_dzj5KOmkpKoSPCuaKPqYqmAx_zP3CUHOEPTgvu2NcgXvP0ixksM_8BtOyVVK_YA_YYSP8TmFX2wgVu4HOJ81tq2U284no1t_dGaXacBRgQ&src-supplier=Compliance+Statements, ComponentLink30Description=https://octopart.com:443/opatz8j6/c1?t=da9r1jQd4zQjw_w6ZlLw14OT-Olb6rZnis77aO1bwvVJE9VZLxP6k91EfUxso6SyEwgc3mQHYqgqdzaIBeeuW6l6C_PMd9OWXk0hzlafdbDo9oRHF78bObiDlVopW-MpZGN62L_bqtt5v3wnCVRPCsoOPixPbBBS4UuAheGlixJp5OmgHHax5z3G59s1jVXQoRaabBS0w2aQZyxUe6oqNMDLdkAlYBf0kYt772jkopSlA7hHQqKSeeywQR1QCbJX8_FT8PJ-KGPUcpOn56JQWBh67x6J5z68Z1FSgYjIuPfF-N0YtkThmqYJeUavB1H-_6-x659USCRP7rJ3bZDcPIEc1AdHEuc&src-supplier=Compliance+Statements, ComponentLink30URL=https://octopart.com:443/opatz8j6/c1?t=da9r1jQd4zQjw_w6ZlLw14OT-Olb6rZnis77aO1bwvVJE9VZLxP6k91EfUxso6SyEwgc3mQHYqgqdzaIBeeuW6l6C_PMd9OWXk0hzlafdbDo9oRHF78bObiDlVopW-MpZGN62L_bqtt5v3wnCVRPCsoOPixPbBBS4UuAheGlixJp5OmgHHax5z3G59s1jVXQoRaabBS0w2aQZyxUe6oqNMDLdkAlYBf0kYt772jkopSlA7hHQqKSeeywQR1QCbJX8_FT8PJ-KGPUcpOn56JQWBh67x6J5z68Z1FSgYjIuPfF-N0YtkThmqYJeUavB1H-_6-x659USCRP7rJ3bZDcPIEc1AdHEuc&src-supplier=Compliance+Statements, Contact Plating="Copper, Silver, Tin", DatasheetVersion="Rev. 7", Element Configuration=Single, Frequency=300MHz, fT Min (MHz)=150, Gain Bandwidth Product=100MHz, Height=4.58mm, hFE Min=200, IC Continuous (A)=0.1, Lead Free="Lead Free", Length=4.58mm, Lifecycle Status=Production, Manufacturer Part Number=BC547B, Max Breakdown Voltage=45V, Max Collector Current=100mA, Mounting Technology="Through Hole", Number of Elements=1, Number of Terminals=3, PackageDescription="3-Pin Transistor Outline, Body 4.825 x 3.685 mm, Pitch 1.27 mm", PackageReference=TO-92-3-29-11_AM_SL, PackageVersion="Rev. AM", Packaging=Bulk, Packing="Bulk Box", PartNumber=BC547B, Pins=3, Polarity=NPN, Pricing="1=0.38, 10=0.234, 100=0.1472, 500=0.10944, 1000=0.09723, 2000=0.08693, 5000=0.07576, 10000=0.06884, 50000=0.05673 (USD)", Radiation Hardening=No, REACH SVHC=Yes, RoHS=FALSE, Stock=6659, Supplier=DigiKey, Transition Frequency=300MHz, Voltage Rating (DC)=45V, Weight=200.005886mg, Width=3.86mm
R2 R9 R22: "16.5 mm, Horizontal, Linear, 50 kÎ©, Through Hole, Knurled Shaft Single Section Rotary Potentiometer", Package=Package, Check_prices=https://www.snapeda.com/parts/PTN16-A50220K1B1/Same+Sky/view-part/?ref=eda, MF="Same Sky", MP=PTN16-A50220K1B1, SnapEDA_Link=https://www.snapeda.com/parts/PTN16-A50220K1B1/Same+Sky/view-part/?ref=snap
R3 R12 R20 R21 R23 R28 R29 R39 R52 R?: "Fixed Resistor, Metal Film, 0.25W, 1000ohm, 250V, 1% +/-Tol, 100ppm/Cel, Through Hole Mount", Case/Package=Axial, Manufacturer="Yageo Group", Manufacturer Part Number=MFR-25FBF52-1K, Max Operating Temperature=155°C, Max Power Dissipation=250mW, Min Operating Temperature=-55°C, Temperature Coefficient=100ppm/°C, Tolerance=1%, Voltage Rating=250V, Voltage Rating (DC)=200V, Category="Through-Hole Resistors", China RoHS=Compliant, ComponentLink1Description=https://datasheet.octopart.com:443/MFR-25FBF52-1K-Yageo-datasheet-175665672.pdf?src-supplier=IHS, ComponentLink1URL=https://datasheet.octopart.com:443/MFR-25FBF52-1K-Yageo-datasheet-175665672.pdf?src-supplier=IHS, ComponentLink2Description=https://datasheet.octopart.com/MFR-25FBF52-1K-Yageo-datasheet-28066692.pdf, ComponentLink2URL=https://datasheet.octopart.com/MFR-25FBF52-1K-Yageo-datasheet-28066692.pdf, ComponentLink3Description=https://datasheet.octopart.com:443/MFR-25FBF52-1K-Yageo-datasheet-12510115.pdf?src-supplier=Upverter, ComponentLink3URL=https://datasheet.octopart.com:443/MFR-25FBF52-1K-Yageo-datasheet-12510115.pdf?src-supplier=Upverter, ComponentLink4Description=https://datasheet.octopart.com:443/MFR-25FBF52-1K-Yageo-datasheet-165493774.pdf?src-supplier=Future+Electronics, ComponentLink4URL=https://datasheet.octopart.com:443/MFR-25FBF52-1K-Yageo-datasheet-165493774.pdf?src-supplier=Future+Electronics, ComponentLink5Description=https://datasheet.octopart.com:443/MFR-25FBF52-1K-Yageo-datasheet-155367622.pdf?src-supplier=Future+Electronics, ComponentLink5URL=https://datasheet.octopart.com:443/MFR-25FBF52-1K-Yageo-datasheet-155367622.pdf?src-supplier=Future+Electronics, ComponentLink6Description=https://datasheet.octopart.com:443/MFR-25FBF52-1K-Yageo-datasheet-17233670.pdf?src-supplier=Future+Electronics, ComponentLink6URL=https://datasheet.octopart.com:443/MFR-25FBF52-1K-Yageo-datasheet-17233670.pdf?src-supplier=Future+Electronics, ComponentLink7Description=https://datasheet.octopart.com:443/MFR-25FBF52-1K-Yageo-datasheet-137700554.pdf?src-supplier=Future+Electronics, ComponentLink7URL=https://datasheet.octopart.com:443/MFR-25FBF52-1K-Yageo-datasheet-137700554.pdf?src-supplier=Future+Electronics, ComponentLink8Description=http://sigma.octopart.com:80/conflict_mineral_statement/Yageo-company-3.pdf?src-supplier=Compliance+Statements, ComponentLink8URL=http://sigma.octopart.com:80/conflict_mineral_statement/Yageo-company-3.pdf?src-supplier=Compliance+Statements, ComponentLink9Description=http://sigma.octopart.com:80/rohs_statement/Yageo-company-2.pdf?src-supplier=Compliance+Statements, ComponentLink9URL=http://sigma.octopart.com:80/rohs_statement/Yageo-company-2.pdf?src-supplier=Compliance+Statements, Composition="Metal Film", Diameter=2.4mm, Lead Diameter=550µm, Lead Free="Lead Free", Lead Length=28mm, Length=6.2992mm, Lifecycle Status=Production, Mounting Technology="Through Hole", Number of Terminals=2, Number of Terminations=2, Packaging=Bulk, Pins=2, Power Dissipation=250mW, Power Rating=250mW, Pricing="1=0.00766, 10=0.00745, 30=0.00726, 50=0.00713, 100=0.00696 (USD)", REACH SVHC=Yes, RoHS=Compliant, Schedule B="8533210090, 8533210090|8533210090|8533210090|8533210090|8533210090|8533210090|8533210090|8533210090|8533210090|8533210090|8533210090|8533210090|8533210090|8533210090|8533210090|8533210090|8533210090|8533210090|8533210090|8533210090|8533210090|8533210090|8533210090|85", Stock=714, Supplier=Avnet, Supplier Part Number=MFR-25FBF52-1K, Termination=Axial, Width=6.3mm, Working Voltage=250V
R10 R26 R27: "TRIMMER - 6MM ROUND, SINGLE-TURN,CERMET, 10K OHMS", Package="3306F Bourns", Check_prices=https://www.snapeda.com/parts/3306F-1-103/Bourns/view-part/?ref=eda, MF=Bourns, MP=3306F-1-103, SnapEDA_Link=https://www.snapeda.com/parts/3306F-1-103/Bourns/view-part/?ref=snap
R11 R15 R17: "RES 66K OHM 5% 1/2W AXIAL", Case/Package=Conformal, Max Operating Temperature=155°C, Min Operating Temperature=-55°C, Power Rating=500mW, Resistance=1.2MR, Resistance Tolerance=5%, Resistor Type="Metal Film", Temperature Coefficient=200ppm/°C, Voltage Rating=3.5kV, Construction=Cylindrical, Contact Plating=Tin, Diameter=4mm, Length=10mm, Military Standard=Not, Mount="Through Hole", Packaging="Ammo Pack", Radiation Hardening=No, Reach SVHC Compliant=Yes, Termination=Axial, Tolerance=5%, Voltage Rating (DC)=3.5kV
U1 U2 U3 U4 U5 U6 U7 U8: library part NE5532, "Dual Low-Noise Operational Amplifier, 10 to 30 V, 0 to 70 degC, 8-pin DIP (P8), Pb-Free (RoHS)", Manufacturer="Texas Instruments", Total Supply Voltage(Max)(+5V is 5, +/-5V is 10)=30, Total Supply Voltage(Min)(+5V is 5, +/-5V is 10)=10, CMRR(Min)(dB)=70, Code_JEDEC=MS-001, ComponentLink1Description="Manufacturer URL", ComponentLink1URL=http://www.ti.com/, ComponentLink2Description=Datasheet, ComponentLink2URL=http://www.ti.com/lit/ds/symlink/ne5532a.pdf, ComponentLink3Description="Package Specification", ComponentLink3URL=http://www.ti.com/litv/pdf/mpdi001b, DatasheetVersion=SLOS075I, Eco-Plan="Pb-Free (RoHS)", GBW(Typ)(MHz)=10, IIB(Max)(pA)=800000, Iq per channel(Max)(mA)=4, Mounting Technology="Through Hole", Number of Channels=2, PackageDescription="8-Pin Plastic In-Line, Body 9.59 x 6.35 mm, Pitch 2.54 mm", PackageReference=P0008A, PackageVersion="4040082/E, 04/2010", PartNumber=NE5532AP, Slew Rate(Typ)(V/us)=9, Sub Family="General Purpose Amplifier, High Supply Voltage Amplifier (>=30V), Low Noise Amp (<=10nV/rtHz)", Vio (25C)(Max)(mV)=4, Vn at 1kHz(Typ)(nV/rtHz)=5

## Free pads (board coordinates)
  round 60 hole 30: 7(4060,610) 8(3400,710) 10(5360,1220) 11(4880,510) 12(4650,570) 13(4060,1310) 14(4070,1520) 15(3780,1530) 16(2600,1600) 17(2590,1270) 18(2800,1280) 19(2880,640) 20(2750,870) 21(3660,1200)
  round 160 hole 137.8: Nut1(220,190) Nut2(1400,1360) Nut3(3650,160) Nut3(5760,240) Nut3(5790,790)

## Via types
v1: diameter 50, hole 28, Top Layer to Bottom Layer, 10 vias

## Nets (pads, with @x,y where several pads share a name; then routed paths per layer and width w, separated by ;. In a path a pad name is that pad's centre, name@x,y a point inside that pad or via, vN(x,y) a via of type N, cw(c..) or ccw(c..) an arc to the next point about the centre after c; other vN are vias at no path point)
12V: C19.1 C20.1 J2.1 pad.16 pad.17 pad.18 pad.Nut3@3650,160 R26.1 R31.2 R32.2 R33.2 R34.2 U1.8 U2.8 U3.8 U4.8 U5.8 U6.8 U7.8 U8.8 | length 10337.5
  Top Layer w20: U7.8 1860,1260 2220,1260 U8.8 2520,1135.15 2560,1175.15 pad.17 ; pad.18@2797.5,1277.5 2882.57,1277.5 2921.52,1238.54 3451.46,1238.54 3580,1110 U1.8 ; U6.8 4472.41,1662.41 v1(4540,1730) ; v1(4546.82,1843.18) 4460,1930 v1(4460,2030) 4465,2035 4465,2085 4540,2160 4918.28,2160 4950,2128.28 v1(4950,2030)
  Bottom Layer w20: R33.2 R31.2 R34.2 R32.2 1633.15,1246.85 U7.8 ; pad.17 pad.17@2595,1275 ; pad.16 2595,1595 pad.17@2595,1275 ; pad.16@2606.26,1603.74 U3.8 ; pad.18 2795,1275 pad.17@2595,1275 ; R26.1 3340,100 3571.01,100 3631.01,160 pad.Nut3@3650,160 ; pad.Nut3@3650,111.57 3812.2,111.57 C19.1 ; U1.8 3950,860 3950,569.37 C19.1 ; U4.8 4327.37,1962.31 4395,2029.94 4459.94,2029.94 v1(4460,2030) ; v1(4540,1730) v1(4546.82,1843.18) ; v1(4950,2030) 4953.12,2026.88 5013.12,2026.88 v1(5190,1850) 5190,1759.83 5350.34,1599.49 5430.51,1599.49 U5.8 5280.15,1270.15 5280.15,1190.15 U2.8 4970,950 4860,840 4860,600.71 4820,560.71 4820,560 4665,405 C20.1 4523.43,358.43 J2.1 4160.94,358.43 C19.1
-12V: C23.2 C24.1 J2.3 pad.11 pad.13 pad.19 pad.20 pad.21 R27.3 U1.4 U2.4 U3.4 U4.4 U5.4 U6.4 U7.4 U8.4 | length 7881.7
  Top Layer w20: pad.20 2815,805 2815,705 pad.19 ; pad.21 3660,1210 3700,1250 4000,1250 pad.13 4060,1310.23 4017.69,1352.54 U4.4 ; C23.2 4319.69,111.26 J2.3 4461.57,70 4685,70 C24.1 ; U2.4 pad.11 pad.11@4886.62,503.38
  Bottom Layer w20: U7.4 1590,840 1680,750 1750,750 1900,900 1978.28,900 1990,888.28 1990,750 2014.98,725.02 2149.16,725.02 2149.16,1107.45 2254.53,1212.81 2350.3,1212.81 U3.4 2467.59,1152.41 pad.20@2751.22,868.78 ; 2154.98,725.02 U8.4 ; pad.19 3011.57,618.43 R27.3 3428.43,618.43 3470,660 3470,740 U1.4 3610,1020 3610,1150 pad.21 ; pad.13 4077.64,1292.61 4087.39,1292.61 4219.9,1160.1 U6.4 4297.69,1110 4750,1110 4810,1050 ; U2.4 4810,720 4810,1050 ; C24.1 4880,265 pad.11 ; U5.4 5150,1140 5120,1140 5063.67,1083.67 4843.67,1083.67 4810,1050
GND: A_out.2 AudioJ.1 C4.1 C8.1 C12.1 C19.2 C20.2 C23.1 C24.2 J2.2 J_Line_In1.2 pad.12 R6.1 R18.1 R26.3 R27.1 R30.1 R35.1 R36.1 R37.1 R41.1 R42.1 R43.1 R45.1 R46.2 R47.1 R48.1 R50.1 U3.3 U4.3 U4.5 U6.3 | length 17824.3
  Top Layer w20: C4.1 3330,1005 3330,760 3240,670 3240,510 R27.1 ; U4.3 4269.48,1699.95 4299.43,1670 U4.5@4320.57,1670 ; v1(4249.38,1559.38) 4284.3,1525.7 4296.01,1513.99 4300,1510 4300,1332.45 U6.3 4302.46,1257.54 4320,1240 4320,1130 4380,1070 4380,750 4560,570 pad.12 4650,510.59 C24.2 ; C12.1 5220.12,1720 A_out.2 ; R18.1 5530,263.15 R30.1
  Bottom Layer w15: 1001.06,21.06 1010,30 ; 1031.7,44.85 R37.1
  Bottom Layer w20: J_Line_In1.2 140.31,800.31 140.31,670.12 180.67,629.76 AudioJ.1 400,269.88 R36.1 463.15,70 616.85,70 R42.1 773.15,40 ; 1016.85,30 1010,30 1000,30 783.15,30 773.15,40 ; 1031.7,44.85 1031.7,40 ; R37.1 1163.15,70 1356.85,70 R43.1 R41.1 R35.1 1744.61,78.54 1895.3,78.54 ; R45.1 1910,710 1790,590 1790,183.84 R50.1 1895.3,78.54 ; U3.3 2448.5,1424.13 2485.87,1424.13 2530,1380 2530,1221.01 2541.72,1209.29 3125.71,1209.29 C4.1 ; R48.1 2578.43,131.57 2441.57,131.57 R46.2 2276.85,130 R47.1 2207.5,123.15 2162.89,78.54 ; R27.1 R26.3 ; R6.1 3626.32,303.15 3614.61,291.43 3614.61,273.41 3588.62,247.43 3510.86,247.43 3498.28,260 3376.85,260 R26.3 ; C23.1 4180,260 ; v1(4249.38,1559.38) 4310,1620 U4.5 4317.47,1677.47 4317.47,1697.47 4513.91,1893.91 4514.14,1894.14 4880,2240 4928.54,2240 5240,2240 v1(5290,2290) 5319.33,2260.67 A_out.2 ; C8.1 4565.11,813.65 4576.82,801.94 4583.58,801.94 4650,735.52 pad.12 ; C24.2 4570,230.59 C20.2 ; R18.1 5296.85,30 4650,30 4576.7,103.3 4576.7,122.71 C20.2 ; 773.15,40 783.15,40 1000,40 1010,40 1016.85,40 1031.7,40 ; 1031.7,40 3819.37,40 C19.2 4180.63,260 J2.2 4439.41,260 C20.2 ; 1895.3,78.54 2162.89,78.54 ; 2162.89,78.54 3098.54,78.54 R26.3
InputEq: D1.A D2.C pad.7 pad.8 R4.1 R13.1 R24.1 R35.2 R47.2 U7.1 U7.2 U8.6 U8.7 | length 7268
  Top Layer w20: U7.1 U7.2 1510,970 1510,660 1603.35,566.65 1650.2,566.65 R35.2 1700,400 1800,300 2120,300 2410,590 2650,590 2750,690 ; R47.2 2273.43,516.85 2516.57,760 U8.6 ; U8.7 U8.6 ; D2.C D1.A 2750,570 2750,690 ; pad.8 3500,610 pad.7 4190,480 4380,480 4590,270 5235.65,270 5533.5,567.85 5631.55,567.85 R24.1 ; U8.6 2733.15,760 R4.1 2750,690
  Bottom Layer w20: U8.6 2590,690 2889.93,690 2909.93,710 pad.8@3392.49,710 ; pad.7@4070,610 4310,850 R13.1
Net5V_1: 5V.1 R52.1 | length 321.6
  Top Layer w20: 5V.1 5661,1837.42 5805.39,1607.76 R52.1
Net5V_2: 5V.2 R39.1 | length 320
  Top Layer w20: 5V.2 5778.89,1557.24 ccw(c5795.39,1568.54) 5786.55,1550.6 5825.39,1531.46 R39.1
NetA_out_1: A_out.1 pad.14 pad.15 R?.2 U3.6 U3.7 | length 3591.6
  Top Layer w15: v1(5460,1970) 5666.85,1970 R?.2
  Top Layer w20: U3.6 2737.4,1505.59 2714.91,1528.09 U3.7 3707.54,1592.46 pad.15@3785.1,1514.9 ; pad.14 4132.67,1614 4133.77,1615.65 4135.16,1617.05 4139.44,1621.32 4145.37,1622.52 4223.85,1638.28 4234.12,1638.28 4262.4,1610 4333.63,1610 4517.57,1793.95 4614.55,1793.95 4733.1,1675.39 5217.94,1675.39 5252.54,1710 5308.54,1710 A_out.1
  Bottom Layer w20: pad.15 3785,1525 4065,1525 pad.14 ; A_out.1 5338.4,1739.86 5338.4,1766.15 5370.33,1798.09 5370.33,1963.12 5377.22,1970 v1@5450,1970 ; v1@5450,1960 v1(5460,1970)
NetC1_1: C1.1 C2.2 U1.1 U1.2 | length 1111.8
  Bottom Layer w20: C1.1 3140.67,814.41 3336.26,1010 U1.2 U1.1 3490,1110 3660,1280 3678.19,1280 C2.2
NetC1_2: C1.2 R4.2 R5.1 | length 339.4
  Bottom Layer w20: R4.2 R5.1 3023.15,1136.85 C1.2
NetC2_1: C2.1 C3.2 R1.1 | length 757.6
  Top Layer w20: C2.1 3859.57,823.03 4046.97,823.03 C3.2
  Bottom Layer w20: R1.1 3830,400.72 3890,460.72 3890,792.6 C2.1
NetC3_1: C3.1 R6.2 U1.5 | length 581.4
  Top Layer w20: U1.5 3702.34,812.34 3759.53,812.34 3894.97,947.78 3902.19,947.78 C3.1
  Bottom Layer w20: R6.2 U1.5
NetC4_2: C4.2 R5.2 U1.3 | length 589.1
  Bottom Layer w20: R5.2 3183.74,743.15 C4.2 3343.12,902.53 3392.53,902.53 U1.3
NetC5_1: C5.1 R13.2 R14.1 | length 278.2
  Bottom Layer w20: R13.2 R14.1 4509.35,603.15 C5.1
NetC5_2: C5.2 C6.2 U2.1 U2.2 | length 800.5
  Top Layer w20: C5.2 4647.33,757.33 U2.2 U2.1 4926.83,950 4976.36,999.53 5147.54,999.53 5185.4,961.66 C6.2
NetC6_1: C6.1 C7.2 R7.1 | length 605.5
  Top Layer w20: R7.1 5190.99,574.69 C6.1 5373.87,868.95 C7.2
NetC7_1: C7.1 R16.2 U2.5 | length 524.7
  Bottom Layer w20: U2.5 5043.43,650 5216.57,476.85 R16.2 5373.87,630.72 C7.1
NetC8_2: C8.2 R14.2 U2.3 | length 425.9
  Bottom Layer w20: R14.2 4525.68,996.85 4557.2,965.32 C8.2 4660,870.43 4660,840 4740,760 U2.3
NetC9_1: C9.1 R24.2 R25.1 | length 2239.2
  Top Layer w20: C9.1 4862.44,1732.44 4889.2,1732.44 4910,1753.24 4910,1760 5080,1930 5438.28,1930 5520.52,1847.76 5520.52,1732.24 5648.29,1604.47 5652.24,1604.47 5780,1476.71 5780,1170 5740,1130 5740,1070 R24.2
  Bottom Layer w20: R24.2 5690,720 5783.7,626.3 R25.1
NetC9_2: C9.2 C10.2 U5.1 U5.2 | length 1103.7
  Top Layer w20: U5.1 U5.2 5397.2,1410 5446.73,1459.53 5613.35,1459.53 5632.1,1440.79 C10.2
  Bottom Layer w20: C9.2 4836.97,1634.61 5095.39,1634.61 U5.1
NetC10_1: C10.1 C11.2 R19.1 | length 1326.7
  Top Layer w20: R19.1 5070,1460 5190,1580 5599.21,1580 C10.1 5710,1469.21 5710,1240.79 C11.2
NetC11_1: C11.1 R28.2 U5.5 | length 1516.6
  Bottom Layer w20: U5.5 5580.79,1210 C11.1 5738.36,1269.21 5760,1247.57 5760,1140.07 5821.52,1078.54 5841.46,1078.54 5870,1050 5870,1020 5890,1000 5890,183.15 R28.2
NetC12_2: C12.2 pad.10 R25.2 U5.3 | length 1500.9
  Top Layer w20: U5.3 5309.43,1220.57 5379.43,1220.57 pad.10
  Bottom Layer w15: pad.10 5395,1185 5415,1185
  Bottom Layer w20: C12.2 5006.18,1664.61 5175.39,1664.61 5366.72,1473.28 5366.72,1456.72 U5.3 ; 5415,1185 5500,1100 5673.08,1100 5753.08,1020 R25.2
NetC13_1: C13.1 Q1.1 R31.1 | length 539
  Bottom Layer w20: Q1.1 636.85,730 R31.1 820,793.15 C13.1
NetC13_2: C13.2 Q2.2 R34.1 R37.2 | length 624.7
  Bottom Layer w20: C13.2 C13.2@904.37,615.63 ; R34.1 904.37,847.52 C13.2@904.37,615.63 ; R37.2 1110,630 1088.54,651.46 1088.54,655.69 1054.23,690 Q2.2 978.74,690 C13.2@904.37,615.63
NetC14_1: C14.1 Q2.1 R32.1 | length 295.3
  Top Layer w20: R32.1 1073.43,856.57 1237.2,856.57 C14.1
  Bottom Layer w20: Q2.1 1050.67,740 1070,759.33 R32.1
NetC14_2: C14.2 R41.2 U7.3 | length 616.7
  Bottom Layer w20: U7.3@1439.37,939.37 1436.84,941.9 1361.9,941.9 1319.37,899.37 C14.2 1390,789.37 1390,690 1537.96,542.04 1537.96,536.79 1550,524.76 R41.2
NetC15_1: C15.1 J_Line_In1.1 | length 211.3
  Top Layer w20: J_Line_In1.1 332.83,948.43 C15.1
NetC15_2: C15.2 Q1.2 R33.1 R36.2 | length 834.5
  Top Layer w20: C15.2 520,840 596.85,840 R33.1
  Bottom Layer w20: R36.2 460,586.85 C15.2 ; Q1.2 533.92,680 523.92,690 511.05,690 499.33,701.72 499.33,758.28 539.46,798.41 555.26,798.41 R33.1
NetC17_1: C17.1 Q1.3 R38.2 | length 553.8
  Top Layer w20: R38.2 542.52,526.85 C17.1
  Bottom Layer w20: R38.2 Q1.3
NetC17_2: C17.2 R38.1 R42.2 | length 805
  Bottom Layer w15: R38.1 579.98,173.13 817.5,173.13 C17.2
  Bottom Layer w20: R38.1 680,273.15 R42.2
NetC18_1: C18.1 Q2.3 R40.2 | length 787.5
  Bottom Layer w20: C18.1 1045.5,615.5 1045.5,635.5 Q2.3 1050,470 1101.72,418.28 1161.43,418.28 R40.2
NetC18_2: C18.2 R40.1 R43.2 | length 927.6
  Bottom Layer w20: C18.2 1027.85,260.89 1122.25,260.89 R40.1 1260,366.85 R43.2
NetC21_1: C21.1 J_Line_In1.3 | length 1230.2
  Top Layer w20: J_Line_In1.3 492.62,751.57 521.05,780 1262.5,780 1325,717.5 C21.1
NetC21_2: C21.2 R44.1 R45.2 | length 890.8
  Top Layer w20: C21.2 1730,660 1810,740 1810,1096.85 R45.2
  Bottom Layer w20: R45.2 R44.1
NetC22_1: C22.1 R49.2 R51.2 U8.1 | length 892.9
  Top Layer w20: R51.2 R49.2
  Bottom Layer w20: C22.1 1970,544.76 1990,524.76 R51.2 ; R49.2 2195.13,516.85 2320,641.72 2320,860 U8.1
NetC22_2: C22.2 R46.1 R48.2 U8.5 | length 1056.5
  Bottom Layer w20: C22.2 2048.74,511.26 2140,420 2236.23,420 2384.54,568.31 2428.31,568.31 U8.5 2520,586.85 R48.2 2578.43,525.28 2441.57,525.28 R46.1
NetD1_C: D1.C R26.2 | length 354.2
  Bottom Layer w20: D1.C 2901.07,190 2954.54,136.54 3058.11,136.54 R26.2
NetD2_A: D2.A R27.2 | length 392.8
  Bottom Layer w20: D2.A 2980,368.43 R27.2
NetD?_A: D?.A LED.1 R52.2 | length 609.2
  Top Layer w20: R52.2 D?.A
  Bottom Layer w15: LED.1 5504.9,2314.9 5625.1,2314.9 D?.A
NetD?_C: D?.C LED.2 Q3.1 | length 601.3
  Top Layer w15: Q3.1 5500,2210 LED.2
  Top Layer w20: Q3.1 5510.67,2147.61 5793.65,2261.84 5796.96,2265.15 5797.85,2267.25 D?.C
NetQ3_2: Q3.2 R?.1 | length 639.1
  Bottom Layer w15: Q3.2 5498.54,2100 5481.41,2117.13 5452.87,2117.13 5390,2180 5390,2320 5430,2360 5496.45,2360 5543.3,2406.85 R?.1
NetQ3_3: Q3.3 R39.2 | length 1341.7
  Bottom Layer w20: Q3.3 5500,2009 5510,1999 5510,1701.72 5521.72,1690 5860,1690 5890,1660 5890,1134.87 5878.28,1123.15 R39.2@5828.02,1123.15
NetR1_2: R1.2 R3.1 U1.6 U1.7 | length 870
  Bottom Layer w20: R3.1@3578.15,298.15 3830,550 R1.2 3765.94,760.91 3765.94,844.06 U1.6 U1.7
NetR2_1: R2.1 R3.2 U3.2 | length 2447.4
  Top Layer w20: U3.2 2757.57,1190 3407.34,1190 3570,1027.34 R3.2